# Altium PCB Relay-Driver-Board-v1.0.PcbDoc (part 3 of 3)
Units mil, origin at the board's own origin, x right, y up, seen from the top; angles counter-clockwise.
Board outline 3472 x 3047 mil, 4 copper layers (Top Layer, POWER, GND, Bottom Layer), stack 62.449 mil thick; 86 components, 50 nets, 261 pads, 281 vias.
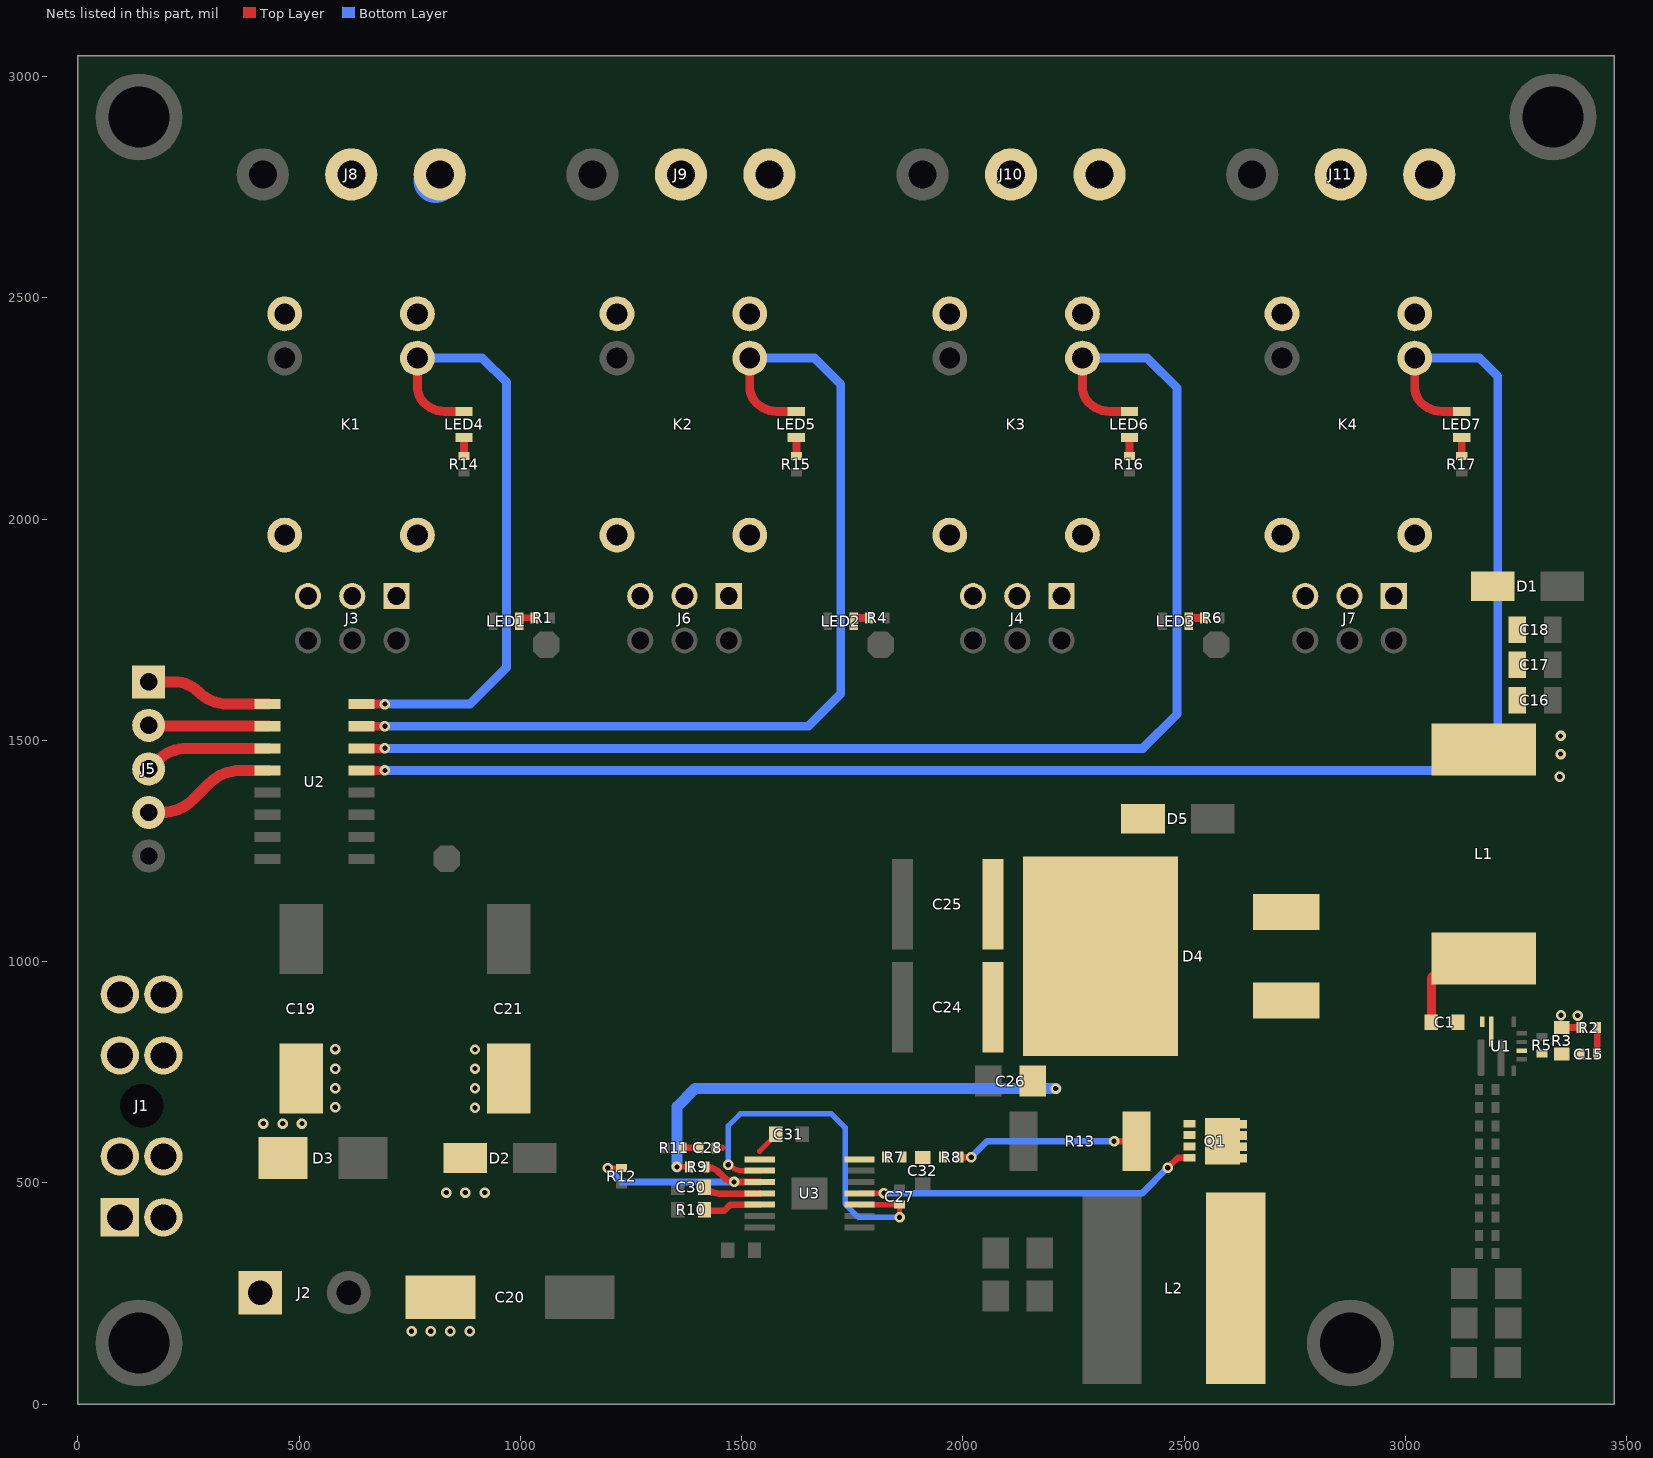
[diagram p4: the nets of this part, all layers, seen from the top]

## Via types
v1: diameter 23.62, hole 11.81, Top Layer to Bottom Layer, 277 vias
v2: diameter 24, hole 12, Top Layer to Bottom Layer, 4 vias

## Nets (pads, with @x,y where several pads share a name; then routed paths per layer and width w, separated by ;. In a path a pad name is that pad's centre, name@x,y a point inside that pad or via, vN(x,y) a via of type N, cw(c..) or ccw(c..) an arc to the next point about the centre after c; other vN are vias at no path point) (continued)
IN-1: J5.1 U2.1 | length 284.5
  Top Layer w25: J5.1@160,1632.35 218.04,1632.35 cw(c218.04,1556.04) 272,1610 ccw(c339.6,1677.6) 309.28,1586.94 ccw(c339.6,1677.6) 339.6,1582 U2.1@431.06,1582
IN-2: J5.2 U2.2 | length 271.6
  Top Layer w25: J5.2@160,1533.93 ccw(c164.65,1538.57) 164.65,1532 U2.2@431.06,1532
IN-3: J5.3 U2.3 | length 286
  Top Layer w25: J5.3@160,1435.5 177.21,1452.71 cw(c247.92,1382) 247.92,1482 U2.3@431.06,1482
IN-4: J5.4 U2.4 | length 301.8
  Top Layer w25: J5.4@160,1337.07 189.65,1337.07 ccw(c189.65,1437.07) 260.36,1366.36 296.71,1402.71 cw(c367.42,1332) 367.42,1432 U2.4@431.06,1432
NetC1_1: C1.1 L1.1 U1.6 | length 235.4
  Top Layer w20: C1.1@3059,863 3059,963.06 3112.94,1017 L1.1@3172,1017
NetC1_2: C1.2 U1.7
NetC15_1: C15.1 R3.1 R5.2 U1.2
NetC15_2: C15.2 R2.1 | length 60
  Top Layer w15: C15.2@3433.5,791 R2.1@3433.5,851
NetC16_2: C16.2 C17.2 C18.2 D1.2 L1.2 R2.2 R3.2 | length 42.5
  Top Layer w15: R3.2@3354,851 R2.2@3396.5,851
  other v1: 3390,878 3352,879 3349,1418 3351,1469 3351,1510
NetC19_1: C19.1 C20.1 C21.1 D2.2 D3.2 J1.3 J1.4 J1.5 J1.6
  other v1: 754.12,164.55 797.32,164.55 841.52,164.55 885.72,164.55 832.31,478 875.51,478 919.71,478 419,634 463.2,634 506.4,634 897.55,669.8 581.45,670.6 581.45,713.8 897.55,714 581.45,758 897.55,758.2 897.55,801.4 581.45,802.2
NetC24_2: C24.2 C25.2 C26.2 D4.3 D5.2 R9.2 | length 1036.6
  Top Layer w12: v1(1353.9,536) R9.2@1381.5,536.02
  Bottom Layer w25: v1(1353.9,536) 1353.9,671.9 1395,713 v1(2210,713)
NetC27_2: C27.2 U3.3 U3.9 | length 876.7
  Top Layer w12: v1(1470.1,541.1) ccw(c1503.12,574.12) 1503.12,527.43 U3.9@1541,527.43 ; U3.3@1766.65,450.66 C27.2@1856,450.66 ; v1(1857,422) C27.2@1857,450.52
  Bottom Layer w12: v1(1470.1,541.1) 1470.1,629.1 1497,656 1703,656 1734,625 1734,452 1764,422 v1(1857,422)
NetC28_1: C28.1 R11.2 | length 38
  Top Layer w15: R11.2@1366.5,579.02 C28.1@1404.5,579.02
NetC28_2: C28.2 C31.1 U3.8 | length 67.5
  Top Layer w12: 1541,571.5 1577,607.5 C31.1@1577,610
  Top Layer w15: C28.2@1441.5,579.02 1455.6,579.02
NetC30_1: C30.1 U3.11 | length 129.1
  Top Layer w15: C30.1@1416,490.02 ccw(c1450.6,524.62) 1450.6,475.69 1540.44,475.69 U3.11@1541,476.25
NetC32_2: C32.2 R7.2 R8.1
NetD4_1: D4.1 D4.2 L2.2 Q1. Q1.5 Q1.6 Q1.7 Q1.8
NetJ1_1: J1.1 J1.2 J1.7 J1.8 J2.1
NetJ8_1: J8.1 K1.3 | length 12.8
  Bottom Layer w100: J8.1@808.94,2764.94 J8.1@818,2774
NetJ8_2: J8.2 K1.4
NetJ9_1: J9.1 K2.3 | length 1.6
  Bottom Layer w100: J9.1@1561.88,2772.88 J9.1@1563,2774
NetJ9_2: J9.2 K2.4
NetJ10_1: J10.1 K3.3
NetJ10_2: J10.2 K3.4
NetJ11_1: J11.1 K4.3
NetJ11_2: J11.2 K4.4
NetLED1_1: LED1.1 R1.2 | length 41.6
  Top Layer w15: LED1.1@997.53,1769 997.53,1774.66 999.87,1777 R1.2@1032.5,1777
NetLED2_1: LED2.1 R4.2 | length 42.5
  Top Layer w18: LED2.1@1753.53,1769 1753.53,1776.06 1754.37,1776.9 1788.5,1776.9 R4.2@1788.5,1777
NetLED3_1: LED3.1 R6.2 | length 34.1
  Top Layer w18: LED3.1@2511.37,1776.9 R6.2@2545.5,1776.9
NetLED4_1: LED4.1 R14.2 | length 42
  Top Layer w18: R14.2@872.67,2142.5 LED4.1@872.67,2184.47
NetLED5_1: LED5.1 R15.2 | length 42
  Top Layer w18: R15.2@1623.67,2142.5 LED5.1@1623.67,2184.47
NetLED6_1: LED6.1 R16.2 | length 42
  Top Layer w18: R16.2@2376.67,2142.5 LED6.1@2376.67,2184.47
NetLED7_1: LED7.1 R17.2 | length 42
  Top Layer w18: R17.2@3127.67,2142.5 LED7.1@3127.67,2184.47
NetQ1_1: Q1.1 Q1.2 Q1.3 R8.2 R13.2 | length 414
  Top Layer w15: R8.2@1996.5,558.02 v1(2018.98,558.02) ; v1(2342,594) R13.2@2392.91,594.02
  Bottom Layer w15: v1@2020.96,559.88 ccw(c2050.32,526.68) v1(2018.98,558.02) 2054.96,594 v1(2342,594)
NetQ1_4: Q1.4 U3.4 | length 779.5
  Top Layer w12: U3.4@1766.65,476.25 v1(1821.75,476.25)
  Top Layer w15: v1(2463,534) 2485.63,556.63 Q1.4@2512,556.63
  Bottom Layer w15: v1@1820.93,476.25 v1(1821.75,476.25) 2386.83,476.25 2405.25,476.25 v1(2463,534)
NetR7_1: R7.1 U3.7
NetR9_1: R9.1 R12.2 U3.10 | length 466.5
  Top Layer w12: v1(1197.5,533.5) R12.2@1229,533.5
  Top Layer w15: R9.1@1420,533.6 1418.5,535.1 R9.1@1418.5,536.02 cw(c1418.5,491.41) 1432.99,533.6 cw(c1418.5,491.41) 1450.05,522.95 1462.51,510.49 ; 1462.53,510.47 ccw(c1483,530.97) 1473.36,503.65 ccw(c1483,530.97) v1(1483,502) ; v1@1483,501.84 U3.10@1541,501.84
  Bottom Layer w15: v1(1197.5,533.5) 1229,502 v1(1483,502)
NetR10_2: R10.2 U3.12 | length 130.7
  Top Layer w15: R10.2@1416,436.89 1460.89,436.89 1474.66,450.66 U3.12@1541,450.66
PWR1: J3.1 J3.3 J3.5 K1.1 K1.6
PWR2: J6.1 J6.3 J6.5 K2.1 K2.6
PWR3: J4.1 J4.3 J4.5 K3.1 K3.6
PWR4: J7.1 J7.3 J7.5 K4.1 K4.6
RELAY-1: K1.5 LED4.2 U2.16 | length 1434.3
  Top Layer w20: U2.16@638.94,1582 v1@693.69,1582 ; K1.5@767.42,2364 767.42,2298.2 ccw(c817.2,2298.2) 782,2263 ccw(c829.01,2310.01) 829.01,2243.53 LED4.2@872.67,2243.53 LED4.2@873.67,2243.53
  Bottom Layer w20: v1(694,1582) 886,1582 969,1665 969,2309 914,2364 K1.5@767.42,2364
RELAY-2: K2.5 LED5.2 U2.15 | length 2246.8
  Top Layer w20: U2.15@638.94,1532 v1@693.69,1532 ; K2.5@1518.42,2364 1518.42,2298.2 ccw(c1568.2,2298.2) 1533,2263 ccw(c1580.01,2310.01) 1580.01,2243.53 LED5.2@1624.67,2243.53
  Bottom Layer w20: v1(694,1532) 1651,1532 1724,1605 1724,2305 1665,2364 K2.5@1518.42,2364
RELAY-3: K3.5 LED6.2 U2.14 | length 3057.8
  Top Layer w20: U2.14@638.94,1482 v1@693.69,1482 ; K3.5@2270.42,2364 2270.42,2298.2 ccw(c2320.2,2298.2) 2285,2263 ccw(c2332.01,2310.01) 2332.01,2243.53 LED6.2@2376.67,2243.53
  Bottom Layer w20: v1(694,1482) 2407,1482 2484,1559 2484,2297 2417,2364 K3.5@2270.42,2364
RELAY-4: K4.5 LED7.2 U2.13 | length 3820.7
  Top Layer w20: U2.13@638.94,1432 693.69,1432 v1@694,1432.31 ; K4.5@3021.42,2364 3021.42,2298.2 ccw(c3071.2,2298.2) 3036,2263 ccw(c3083.01,2310.01) 3083.01,2243.53 LED7.2@3127.67,2243.53
  Bottom Layer w20: v1(694,1432) 3129,1432 3209,1512 3209,2323 3168,2364 K4.5@3021.42,2364
pads on no net: J1. U1.1 U1.4 U1.5 U2.5 U2.6 U2.7 U2.10 U2.11 U2.12 U3.2 U3.13

## Polygon pours and split planes (outlines as drawn)
GND on Bottom Layer "GND_L04_P002" (solid, remove dead copper, pour order 2): 0,3047 3472,3047 3472,0 3394,0 3394,-3 3391,0 0,0
GND on Top Layer "GND_L01_P000" (solid, remove dead copper, pour order 0): 0,3047 3472,3047 3472,0 3394,0 3394,-3 3391,0 0,0
GND on GND (split plane): 3451.9,20.1 20.1,20.1 20.1,3026.9 3451.9,3026.9
NetJ1_1 on POWER (split plane): 506.44,457.8 506.44,20.1 20.1,20.1 20.1,660.44 303.8,660.44
NetC19_1 on POWER (split plane): 979.44,20.1 531.56,20.1 531.56,463 531.32,465.45 530.6,467.81 529.44,469.98 527.88,471.88 317.88,681.88 315.98,683.44 313.81,684.6 311.45,685.32 309,685.56 20.1,685.56 20.1,1007.44 979.44,1007.44
PWR1 on POWER (split plane): 828.44,1843.2 774.8,1789.56 457.2,1789.56 409.56,1837.2 409.56,2017.44 828.44,2017.44
+48V on POWER (split plane): 554.44,1407 554.68,1404.55 555.4,1402.19 556.56,1400.02 558.12,1398.12 560.02,1396.56 562.19,1395.4 564.55,1394.68 567,1394.44 2681.44,1394.44 2681.44,1242.56 469.56,1242.56 469.56,1764.44 554.44,1764.44
+24V on POWER (split plane): 234 vertices, not listed, extent 20.1,20.1 3451.9,3026.9
+12V on POWER (split plane): 3451.9,1812.56 3348,1812.56 3345.55,1812.32 3343.19,1811.6 3341.02,1810.44 3339.12,1808.88 3050.8,1520.56 683.56,1520.56 683.56,1764.44 768.44,1764.44 768.44,1648 768.68,1645.55 769.4,1643.19 770.56,1641.02 772.12,1639.12 774.02,1637.56 776.19,1636.4 778.55,1635.68 781,1635.44 1422,1635.44 1424.45,1635.68 1426.81,1636.4 1428.98,1637.56 1430.88,1639.12 1432.44,1641.02 1433.6,1643.19 1434.32,1645.55 1434.56,1648 1434.56,1764.44 1522.44,1764.44 1522.44,1648 1522.68,1645.55 1523.4,1643.19 1524.56,1641.02 1526.12,1639.12 1528.02,1637.56 1530.19,1636.4 1532.55,1635.68 1535,1635.44 2174,1635.44 2176.45,1635.68 2178.81,1636.4 2180.98,1637.56 2182.88,1639.12 2184.44,1641.02 2185.6,1643.19 2186.32,1645.55 2186.56,1648 2186.56,1764.44 2606.44,1764.44 2606.44,1648 2606.68,1645.55 2607.4,1643.19 2608.56,1641.02 2610.12,1639.12 2612.02,1637.56 2614.19,1636.4 2616.55,1635.68 2619,1635.44 2925,1635.44 2927.45,1635.68 2929.81,1636.4 2931.98,1637.56 2933.88,1639.12 2935.44,1641.02 2936.6,1643.19 2937.32,1645.55 2937.56,1648 2937.56,1764.44 3034,1764.44 3036.45,1764.68 3038.81,1765.4 3040.98,1766.56 3042.88,1768.12 3044.44,1770.02 3044.98,1771.02 3045.98,1771.56 3047.88,1773.12 3103.88,1829.12 3225.2,1950.44 3451.9,1950.44
NetC16_2 on POWER (split plane): 3451.9,839.56 3290.56,839.56 3290.56,1530.44 3451.9,1530.44
PWR2 on POWER (split plane): 1579.44,1843.2 1526.12,1789.88 1525.85,1789.56 1208.2,1789.56 1160.56,1837.2 1160.56,2017.44 1579.44,2017.44
PWR4 on POWER (split plane): 3082.44,1843.2 3030.12,1790.88 3029.03,1789.56 2711.2,1789.56 2663.56,1837.2 2663.56,2017.44 3082.44,2017.44
PWR3 on POWER (split plane): 2331.44,1843.2 2277.8,1789.56 1960.2,1789.56 1912.56,1837.2 1912.56,2017.44 2331.44,2017.44

## Other copper
Top Layer:
  rectangle net +24V: 2144,37 2414,479.04
  rectangle net +24V: 605,1164 678,1247
  region net GND: 3353,710 3195,710 3195,54 3353,54
  rectangle net NetQ1_1: 2361,574 2526,667
  region net NetC28_2: 1592.46,545.59 1592.46,605.43 1503.12,605.43 1503.12,545.59
  region net NetC28_2: 1592.46,565 1592.46,634 1432,634 1432,565
  region net GND: 1484.22,294 1484.22,368.45 1358,368.45 1358,294
  rectangle net GND: 1718,660 2100,763.8
  rectangle net GND: 1707,659 1926,1372
  rectangle net NetQ1_1: 2308,521.98 2430,666.98
  rectangle net GND: 2038,522 2198,667
  region net GND: 2038.42,636 2038.42,37 2110,37 2110,636
  region net GND: 2038.42,746.43 2038.42,511 2100,511 2100,746.43
  rectangle net GND: 1841,478 1931,503
  rectangle net GND: 1799,496 1931,535
  rectangle net GND: 1669,494 1803,535
  region net GND: 1697,216 1697,300 1256,300 1256,216
  region net NetC19_1: 539,832 386,832 386,505 539,505
  region net NetQ1_4: 2527.32,512 2527.32,565.96 2444.32,565.96 2444.32,512
  region net +24V: 1813.27,347 1813.27,406.84 1730.27,406.84 1730.27,347
  rectangle net +24V: 1505,324 1578,407
  region net NetC32_2: 1968,572 1855,572 1855,542 1968,542
  rectangle net NetD4_1: 2549,38 2734,1161.37
  rectangle net NetC24_2: 2123.69,683 2486,860.88
  region net NetD4_1: 2811,802 2811,1161.37 2648.73,1161.37 2648.73,802
  rectangle net NetC24_2: 2014,788 2487,1376
  rectangle net +24V: 2250,37 2414,221
  rectangle net GND: 1320,283.02 1372,512
  rectangle net GND: 1250.93,216 1334.93,598
  rectangle net +12V: 3303,1805 3453,1930
  rectangle net NetC16_2: 3336,833 3406,893
  region net NetC16_2: 2962,1539 2962,1355 3395,1355 3395,1539
  rectangle net NetC16_2: 3051.82,1419 3179,1783.01
  region net NetC16_2: 3155.66,1686.17 3249.84,1787.17 3146,1884 3051.82,1783.01
  rectangle net NetC15_1: 3296,775 3406,804
  region net GND: 3321,826 3209,826 3209,812 3321,812
  region net NetC1_1: 2962,1080 2962,900 3395,900 3395,1080
  region net GND: 3303,1788 3303,1552 3428,1552 3428,1788
  region net NetR7_1: 1837,572 1732,572 1732,545.02 1837,545.02
  region net +48V: 2720,1640 1227,1640 1227,1532 2720,1532
  region net +48V: 1317,1532 1317,1763.25 1216,1763.25 1216,1532
  region net +48V: 2069,1532 2069,1763.25 1967,1763.25 1967,1532
  region net +48V: 2817,1248 2817,1763.25 2716,1763.25 2716,1248
  rectangle net +24V: 3023,53 3103,321
  region net +24V: 3022,825.3 3022,54 3180,54 3180,825.3
  region net +48V: 2720,1248 2720,1568 2516,1568 2516,1248
  region net NetJ9_2: 1581.84,2412.16 1581.84,2545 1295,2545 1295,2412.16
  region net NetJ10_2: 2333.84,2412.16 2333.84,2545 2041,2545 2041,2412.16
  region net NetJ11_2: 3084.84,2412.16 3084.84,2545 2786,2545 2786,2412.16
  rectangle net NetJ11_2: 2786,2414 2924,2847
  rectangle net NetJ10_2: 2041,2414 2179,2847
  rectangle net NetJ9_2: 1295,2414 1433,2847
  rectangle net NetJ8_2: 550,2414 688,2847
  region net NetJ8_2: 830.84,2412.16 830.84,2545 550.84,2545 550.84,2412.16
  rectangle net GND: 1613,262 1697,640
  rectangle net PWR4: 2718,1784 3027.49,2006
  rectangle net PWR4: 2663,1845 3083,2021
  region net PWR4: 3027.49,1784 3083.73,1844.32 3048.76,1876.92 2992.52,1816.61
  region net PWR4: 2754.31,1817.86 2698.27,1877.96 2661.95,1844.1 2718,1784
  rectangle net PWR3: 1967,1784 2276.49,2006
  rectangle net PWR3: 1912,1845 2332,2021
  region net PWR3: 2276.49,1784 2332.73,1844.32 2297.76,1876.92 2241.52,1816.61
  region net PWR3: 2003.31,1817.86 1947.27,1877.96 1910.95,1844.1 1967,1784
  rectangle net PWR2: 1215,1784 1524.49,2006
  rectangle net PWR2: 1160,1845 1580,2021
  region net PWR2: 1524.49,1784 1580.73,1844.32 1545.76,1876.92 1489.52,1816.61
  region net PWR2: 1251.31,1817.86 1195.27,1877.96 1158.95,1844.1 1215,1784
  region net PWR1: 500.31,1817.86 444.27,1877.96 407.95,1844.1 464,1784
  region net PWR1: 773.49,1784 829.73,1844.32 794.76,1876.92 738.52,1816.61
  rectangle net NetC16_2: 3146,1420 3282,1884
  rectangle net NetC15_1: 3251.79,791.07 3404,804.07
  region net GND: 3195,767 3195,654.9 3282,654.9 3282,767
  region net GND: 3209,766.21 3209,689.9 3252,689.9 3252,766.21
  region net NetC1_1: 3187,980 3187,807 3201,807 3201,980
  region net NetC1_2: 3179.31,886 3103,886 3103,843 3179.31,843
  rectangle net PWR1: 409,1845 829,2021
  rectangle net PWR1: 464,1784 773.49,2006
  rectangle net GND: 1050,141 1219,292
  region net +24V: 1125,497.63 1125,611 965,611 965,497.63
  rectangle net GND: 919,957 1084,1151
  rectangle net GND: 450,957 615,1151
  region net NetC19_1: 900.6,292.45 728.15,292.45 728.15,141.45 900.6,141.45
  region net NetC19_1: 950.76,141 950.76,832 727,832 727,141
  region net NetC19_1: 1025,649.2 1025,821.65 859,821.65 859,649.2
  region net NetC19_1: 1039,623 1039,832 386,832 386,623
  rectangle net GND: 564,456 713,607
  pour cut-out: 2235,509 2735,509 2735,15 2235,15
  pour cut-out: 316,2974.99 3156,2976.99 3156,1882 316,1882 316,2572
  pour cut-out: 2913,1551 3472,1551 3472,928 2913,928
Bottom Layer:
  rectangle net NetJ11_1: 2650,2412.07 2783.32,2653
  region net NetJ11_1: 2650,2653 2650,2516 3124,2516 3124,2653
  region net NetJ11_1: 3127,2847 2982,2847 2982,2516 3127,2516
  rectangle net NetJ10_1: 1901,2412.07 2034.32,2653
  region net NetJ10_1: 1901,2653 1901,2516 2379,2516 2379,2653
  region net NetJ10_1: 2382,2847 2237,2847 2237,2516 2382,2516
  rectangle net NetJ9_1: 1148.44,2411.51 1281.76,2652.44
  region net NetJ9_1: 1153.44,2652.44 1153.44,2515.44 1632.44,2515.44 1632.44,2652.44
  region net NetJ9_1: 1635.44,2846.44 1490.44,2846.44 1490.44,2515.44 1635.44,2515.44
  region net NetJ8_1: 891,2847 746,2847 746,2516 891,2516
  region net NetJ8_1: 409,2653 409,2516 888,2516 888,2653
  rectangle net NetJ8_1: 403,2412.07 536.32,2653
  pour cut-out: 316,2975.99 3156,2977.99 3156,1882 316,1882 316,2572
POWER (plane layer: these items are gaps in the copper):
  lines w5: 0,1 1,0 ; 991,0 992,1 ; 3471,1963 3472,1962
  lines w20: 1405,1778 1415,1778 1422,1771
  lines w25: 0,1 0,655 ; 1,0 507,0 ; 452,1777 780,1777 ; 567,1775 567,1407 2694,1407 2694,1230 457,1230 457,1772 397,1832 397,2030 841,2030 841,1838 781,1778 781,1648 1422,1648 1422,1771 ; 671,1771 671,1508 3056,1508 3348,1800 3472,1800 3472,1962 ; 991,0 519,0 519,463 309,673 0,673 0,1020 991,1020 ; 992,0.5 992,1020 ; 1531,1777 1203,1777 1148,1832 1148,2030 1592,2030 1592,1838 1535,1781 1535,1648 2174,1648 2174,1771 ; 2271,1777 2619,1777 2619,1648 2925,1648 2925,1771 ; 3034,1777 2706,1777 2651,1832 2651,2030 3095,2030 3095,1838 ; 3039,1782 3095,1838 ; 3471,1963 3220,1963 3095,1838 ; 1900,1832 1955,1777 2283,1777 2344,1838 2344,2030 1900,2030 1900,1832 ; 3278,827 3278,1543 3472,1543 3472,827 3278,827

## Silkscreen, mask and mechanical layers (free items; w line width, h text height)
Top Overlay:
  lines w7: 1314,483 1329,494.47 ; 1338,523.8 1361,523.8 ; 2972,764 3119,764 3140.66,742.35 ; 3131,742.35 3140.66,742.35 ; 3140.66,752 3140.66,742.35 ; 2825,248 2963,248 2963,950 2825,950 2825,248 ; 3090,46 3090,322 3145,322 3145,737 3225,737 3225,323 3276,323 3276,46 3090,46
  text "GND" at 340.5,2975.73 h75
  text "NO" at 540.5,2975.73 h75
  text "NC" at 740.5,2975.73 h75
  text "GND" at 1085.5,2975.73 h75
  text "NO" at 1285.5,2975.73 h75
  text "NC" at 1485.5,2975.73 h75
  text "GND" at 1831.5,2975.73 h75
  text "NO" at 2031.5,2975.73 h75
  text "NC" at 2231.5,2975.73 h75
  text "GND" at 2576.5,2975.73 h75
  text "NO" at 2776.5,2975.73 h75
  text "NC" at 2976.5,2975.73 h75
  text "RELAY - 1" at 988.27,2600 h75 r90
  text "RELAY - 2" at 1733.27,2600 h75 r90
  text "RELAY - 3" at 2479.27,2600 h75 r90
  text "RELAY - 4" at 3224.27,2600 h75 r90
  text "RELAY BOARD - v1.0" at 64.39,2263.69 h60 r90
  text "48V" at 899,1693.33 h60
  text "24V" at 1655,1693.33 h60
  text "12V" at 2412,1693.33 h60
  text "GND" at 876.05,1205.11 h60
  text "SIGNAL INPUT" at 66.27,1139 h75 r90
  text "24V INPUT" at 290,2.73 h75
Bottom Overlay:
  drawing of 16 lines, arcs and shapes, not listed
  text "IN _ 1" at 374.16,1600 h60
  text "IN _ 2" at 374.16,1501.57 h60
  text "IN _ 3" at 374.16,1403.15 h60
  text "IN _ 4" at 374.16,1304.72 h60
  text "GND" at 374.16,1206.3 h60
  text "ZERO CARBON FOOTPRINT" at 2043,8 h40
  text "24V" at 460.93,2.35 h80 r90
  text "GND" at 660.93,2.35 h80 r90
Board Outline:
  lines w5: 505,2862 cw(c515,2862) 515,2872 cw(c515,2862) 525,2862 ; 505.07,2862 505.44,2679.97 ccw(c515.44,2679.97) 515.44,2669.97 ccw(c515.44,2679.97) 525.44,2679.97 525.07,2862 ; 705,2862 cw(c715,2862) 715,2872 cw(c715,2862) 725,2862 ; 705.07,2862 705.44,2679.97 ccw(c715.44,2679.97) 715.44,2669.97 ccw(c715.44,2679.97) 725.44,2679.97 725.07,2862 ; 901,2862 cw(c911,2862) 911,2872 cw(c911,2862) 921,2862 ; 901.07,2862 901.44,2679.97 ccw(c911.44,2679.97) 911.44,2669.97 ccw(c911.44,2679.97) 921.44,2679.97 921.07,2862 ; 1250,2862 cw(c1260,2862) 1260,2872 cw(c1260,2862) 1270,2862 ; 1250.07,2862 1250.44,2679.97 ccw(c1260.44,2679.97) 1260.44,2669.97 ccw(c1260.44,2679.97) 1270.44,2679.97 1270.07,2862 ; 1450,2862 cw(c1460,2862) 1460,2872 cw(c1460,2862) 1470,2862 ; 1450.07,2862 1450.44,2679.97 ccw(c1460.44,2679.97) 1460.44,2669.97 ccw(c1460.44,2679.97) 1470.44,2679.97 1470.07,2862 ; 1646,2862 cw(c1656,2862) 1656,2872 cw(c1656,2862) 1666,2862 ; 1646.07,2862 1646.44,2679.97 ccw(c1656.44,2679.97) 1656.44,2669.97 ccw(c1656.44,2679.97) 1666.44,2679.97 1666.07,2862 ; 1996,2862 cw(c2006,2862) 2006,2872 cw(c2006,2862) 2016,2862 ; 1996.07,2862 1996.44,2679.97 ccw(c2006.44,2679.97) 2006.44,2669.97 ccw(c2006.44,2679.97) 2016.44,2679.97 2016.07,2862 ; 2196,2862 cw(c2206,2862) 2206,2872 cw(c2206,2862) 2216,2862 ; 2196.07,2862 2196.44,2679.97 ccw(c2206.44,2679.97) 2206.44,2669.97 ccw(c2206.44,2679.97) 2216.44,2679.97 2216.07,2862 ; 2392,2862 cw(c2402,2862) 2402,2872 cw(c2402,2862) 2412,2862 ; 2392.07,2862 2392.44,2679.97 ccw(c2402.44,2679.97) 2402.44,2669.97 ccw(c2402.44,2679.97) 2412.44,2679.97 2412.07,2862 ; 2741,2862 cw(c2751,2862) 2751,2872 cw(c2751,2862) 2761,2862 ; 2741.07,2862 2741.44,2679.97 ccw(c2751.44,2679.97) 2751.44,2669.97 ccw(c2751.44,2679.97) 2761.44,2679.97 2761.07,2862 ; 2941,2862 cw(c2951,2862) 2951,2872 cw(c2951,2862) 2961,2862 ; 2941.07,2862 2941.44,2679.97 ccw(c2951.44,2679.97) 2951.44,2669.97 ccw(c2951.44,2679.97) 2961.44,2679.97 2961.07,2862 ; 3137,2862 cw(c3147,2862) 3147,2872 cw(c3147,2862) 3157,2862 ; 3137.07,2862 3137.44,2679.97 ccw(c3147.44,2679.97) 3147.44,2669.97 ccw(c3147.44,2679.97) 3157.44,2679.97 3157.07,2862
  lines w15: 0,0 0,3047 3472,3047 3472,0 0,0
Fabrication:
  drawing of 295 lines, arcs and shapes, not listed
  text "Layer" at 3858.2,1540 h60
  text "Name" at 4268.11,1540 h60
  text "Material" at 5197.85,1540 h60
  text "Thickness" at 6057.62,1540 h60
  text "Constant" at 6707.46,1540 h60
  text "Board Layer Stack" at 7277.32,1540 h60
  text "Top Overlay" at 4268.11,1420 h60
  text "Top Solder" at 4268.11,1300 h60
  text "Solder Resist" at 5197.85,1300 h60
  text "0.39mil" at 6057.62,1300 h60
  text "3.5" at 6707.46,1300 h60
  text "1" at 3858.2,1180 h60
  text "Top Layer" at 4268.11,1180 h60
  text "1.38mil" at 6057.62,1180 h60
  text "Dielectric 2" at 4268.11,1060 h60
  text "PP-006" at 5197.85,1060 h60
  text "8.28mil" at 6057.62,1060 h60
  text "4.1" at 6707.46,1060 h60
  text "2" at 3858.2,940 h60
  text "POWER" at 4268.11,940 h60
  text "CF-004" at 5197.85,940 h60
  text "0.60mil" at 6057.62,940 h60
  text "Dielectric 1" at 4268.11,820 h60
  text "FR-4" at 5197.85,820 h60
  text "41.93mil" at 6057.62,820 h60
  text "4.6" at 6707.46,820 h60
  text "3" at 3858.2,700 h60
  text "GND" at 4268.11,700 h60
  text "CF-004" at 5197.85,700 h60
  text "0.60mil" at 6057.62,700 h60
  text "Dielectric 3" at 4268.11,580 h60
  text "PP-006" at 5197.85,580 h60
  text "8.28mil" at 6057.62,580 h60
  text "4.1" at 6707.46,580 h60
  text "4" at 3858.2,460 h60
  text "Bottom Layer" at 4268.11,460 h60
  text "1.38mil" at 6057.62,460 h60
  text "Bottom Solder" at 4268.11,340 h60
  text "Solder Resist" at 5197.85,340 h60
  text "0.39mil" at 6057.62,340 h60
  text "3.5" at 6707.46,340 h60
  text "Bottom Overlay" at 4268.11,220 h60
  text "Total board thickness:" at 3858.2,100 h60
  text "63.24mil" at 6057.62,100 h60
Drill Drawing:
  circle w10: c3909.62,3420.83 r20
  circle w10: c3909.62,3420.83 r33.33
  circle w10: c3909.62,2520.83 r33.33
  lines w10: 3876.29,2104.17 3942.96,2104.17 3909.62,2037.5 3876.29,2104.17 ; 3876.29,2254.17 3942.96,2254.17 3909.62,2187.5 3876.29,2254.17 ; 3876.29,2370.83 3909.62,2337.5 3942.96,2370.83 3909.62,2404.17 3876.29,2370.83 ; 3876.29,2654.17 3892.96,2654.17 3892.96,2637.5 3926.29,2637.5 3926.29,2654.17 3942.96,2654.17 3942.96,2687.5 3926.29,2687.5 3926.29,2704.17 3892.96,2704.17 3892.96,2687.5 3876.29,2687.5 3876.29,2654.17 ; 3876.29,2787.5 3876.29,2804.17 3892.96,2820.83 3876.29,2837.5 3876.29,2854.17 3892.96,2854.17 3909.62,2837.5 3926.29,2854.17 3942.96,2854.17 3942.96,2837.5 3926.29,2820.83 3942.96,2804.17 3942.96,2787.5 3926.29,2787.5 3909.62,2804.17 3892.96,2787.5 3876.29,2787.5 ; 3876.29,2937.5 3942.96,2937.5 3942.96,3004.17 3876.29,3004.17 3876.29,2937.5 ; 3876.29,3104.17 3892.96,3104.17 3909.62,3087.5 3926.29,3104.17 3942.96,3104.17 3926.29,3120.83 3942.96,3137.5 3926.29,3137.5 3909.62,3154.17 3892.96,3137.5 3876.29,3137.5 3892.96,3120.83 3876.29,3104.17 ; 3876.29,3237.5 3942.96,3237.5 3942.96,3304.17 3876.29,3304.17 3876.29,3237.5 ; 3889.62,2090.83 3929.62,2090.83 3909.62,2050.83 3889.62,2090.83 ; 3889.62,3250.83 3929.62,3250.83 3929.62,3290.83 3889.62,3290.83 3889.62,3250.83
  lines w15: 3816.5,1992.5 13789.72,1992.5 ; 3816.5,3492.5 13789.72,3492.5 ; 4367.38,1842.5 4367.38,3642.5 ; 4957.22,1842.5 4957.22,3642.5 ; 6106.88,1842.5 6106.88,3642.5 ; 6612.76,1842.5 6612.76,3642.5 ; 7346.56,1842.5 7346.56,3642.5 ; 8846.11,1842.5 8846.11,3642.5 ; 9435.96,1842.5 9435.96,3642.5 ; 10181.76,1842.5 10181.76,3642.5 ; 11521.36,1842.5 11521.36,3642.5 ; 12387.12,1842.5 12387.12,3642.5 ; 3816.5,1842.5 13789.72,1842.5 13789.72,3642.5 3816.5,3642.5 3816.5,1842.5
  text "Symbol" at 3906.5,3537.5 h72
  text "Count" at 4412.38,3537.5 h72
  text "Hole Size" at 5002.22,3537.5 h72
  text "Plated" at 6151.88,3537.5 h72
  text "Hole Type" at 6657.76,3537.5 h72
  text "Drill Layer Pair" at 7391.56,3537.5 h72
  text "Via/Pad" at 8891.11,3537.5 h72
  text "Pad Shape" at 9480.96,3537.5 h72
  text "Template" at 10226.76,3537.5 h72
  text "Hole Length" at 11566.36,3537.5 h72
  text "Routed Path Length" at 12432.12,3537.5 h72
  text "277" at 4412.38,3387.5 h60
  text "11.81mil (0.300mm)" at 5002.22,3387.5 h60
  text "PTH" at 6151.88,3387.5 h60
  text "Round" at 6657.76,3387.5 h60
  text "Top Layer - Bottom Layer" at 7391.56,3387.5 h60
  text "Via" at 8891.11,3387.5 h60
  text "Rounded" at 9480.96,3387.5 h60
  text "v60h30" at 10226.76,3387.5 h60
  text "-" at 11566.36,3387.5 h60
  text "-" at 12432.12,3387.5 h60
  text "4" at 4412.38,3237.5 h60
  text "12.00mil (0.305mm)" at 5002.22,3237.5 h60
  text "PTH" at 6151.88,3237.5 h60
  text "Round" at 6657.76,3237.5 h60
  text "Top Layer - Bottom Layer" at 7391.56,3237.5 h60
  text "Via" at 8891.11,3237.5 h60
  text "Rounded" at 9480.96,3237.5 h60
  text "v61h30" at 10226.76,3237.5 h60
  text "-" at 11566.36,3237.5 h60
  text "-" at 12432.12,3237.5 h60
  text "5" at 4412.38,3087.5 h60
  text "39.37mil (1.000mm)" at 5002.22,3087.5 h60
  text "PTH" at 6151.88,3087.5 h60
  text "Round" at 6657.76,3087.5 h60
  text "Top Layer - Bottom Layer" at 7391.56,3087.5 h60
  text "Pad" at 8891.11,3087.5 h60
  text "(Mixed)" at 9480.96,3087.5 h60
  text "(Mixed)" at 10226.76,3087.5 h60
  text "-" at 11566.36,3087.5 h60
  text "-" at 12432.12,3087.5 h60
  text "24" at 4412.38,2937.5 h60
  text "40.16mil (1.020mm)" at 5002.22,2937.5 h60
  text "PTH" at 6151.88,2937.5 h60
  text "Round" at 6657.76,2937.5 h60
  text "Top Layer - Bottom Layer" at 7391.56,2937.5 h60
  text "Pad" at 8891.11,2937.5 h60
  text "(Mixed)" at 9480.96,2937.5 h60
  text "(Mixed)" at 10226.76,2937.5 h60
  text "-" at 11566.36,2937.5 h60
  text "-" at 12432.12,2937.5 h60
  text "24" at 4412.38,2787.5 h60
  text "47.24mil (1.200mm)" at 5002.22,2787.5 h60
  text "PTH" at 6151.88,2787.5 h60
  text "Round" at 6657.76,2787.5 h60
  text "Top Layer - Bottom Layer" at 7391.56,2787.5 h60
  text "Pad" at 8891.11,2787.5 h60
  text "Rounded" at 9480.96,2787.5 h60
  text "c200h120m205mx205p200" at 10226.76,2787.5 h60
  text "-" at 11566.36,2787.5 h60
  text "-" at 12432.12,2787.5 h60
  text "2" at 4412.38,2637.5 h60
  text "55.12mil (1.400mm)" at 5002.22,2637.5 h60
  text "PTH" at 6151.88,2637.5 h60
  text "Round" at 6657.76,2637.5 h60
  text "Top Layer - Bottom Layer" at 7391.56,2637.5 h60
  text "Pad" at 8891.11,2637.5 h60
  text "(Mixed)" at 9480.96,2637.5 h60
  text "(Mixed)" at 10226.76,2637.5 h60
  text "-" at 11566.36,2637.5 h60
  text "-" at 12432.12,2637.5 h60
  text "8" at 4412.38,2487.5 h60
  text "59.06mil (1.500mm)" at 5002.22,2487.5 h60
  text "PTH" at 6151.88,2487.5 h60
  text "Round" at 6657.76,2487.5 h60
  text "Top Layer - Bottom Layer" at 7391.56,2487.5 h60
  text "Pad" at 8891.11,2487.5 h60
  text "(Mixed)" at 9480.96,2487.5 h60
  text "(Mixed)" at 10226.76,2487.5 h60
  text "-" at 11566.36,2487.5 h60
  text "-" at 12432.12,2487.5 h60
  text "12" at 4412.38,2337.5 h60
  text "62.99mil (1.600mm)" at 5002.22,2337.5 h60
  text "PTH" at 6151.88,2337.5 h60
  text "Round" at 6657.76,2337.5 h60
  text "Top Layer - Bottom Layer" at 7391.56,2337.5 h60
  text "Pad" at 8891.11,2337.5 h60
  text "Rounded" at 9480.96,2337.5 h60
  text "c300h160m305mx305p300" at 10226.76,2337.5 h60
  text "-" at 11566.36,2337.5 h60
  text "-" at 12432.12,2337.5 h60
  text "1" at 4412.38,2187.5 h60
  text "98.43mil (2.500mm)" at 5002.22,2187.5 h60
  text "NPTH" at 6151.88,2187.5 h60
  text "Round" at 6657.76,2187.5 h60
  text "Top Layer - Bottom Layer" at 7391.56,2187.5 h60
  text "Pad" at 8891.11,2187.5 h60
  text "Rounded" at 9480.96,2187.5 h60
  text "c0hn250p0" at 10226.76,2187.5 h60
  text "-" at 11566.36,2187.5 h60
  text "-" at 12432.12,2187.5 h60
  text "4" at 4412.38,2037.5 h60
  text "137.79mil (3.500mm)" at 5002.22,2037.5 h60
  text "NPTH" at 6151.88,2037.5 h60
  text "Round" at 6657.76,2037.5 h60
  text "Top Layer - Bottom Layer" at 7391.56,2037.5 h60
  text "Pad" at 8891.11,2037.5 h60
  text "Rounded" at 9480.96,2037.5 h60
  text "c500hn350" at 10226.76,2037.5 h60
  text "-" at 11566.36,2037.5 h60
  text "-" at 12432.12,2037.5 h60
  text "361 Total" at 4412.38,1887.5 h60

## Dimensions
0,3047 to 0,0 on Dimensions
3472,3047 to 0,2123 on Dimensions

## Text inside footprints (layer, text, board x,y; h text height)
J1: Top Overlay "1" at 103,354 h31.5 r90